# Altium PCB LEDControl1.PcbDoc (part 5 of 6)
Units mm, origin at the board's own origin, x right, y up, seen from the top; angles counter-clockwise.
Board outline 380 x 185 mm, 2 copper layers (Top Layer, Bottom Layer), stack 0.533 mm thick; 673 components, 368 nets, 1993 pads, 2553 vias.
Unrouted connection lines stored in the file: 1155.
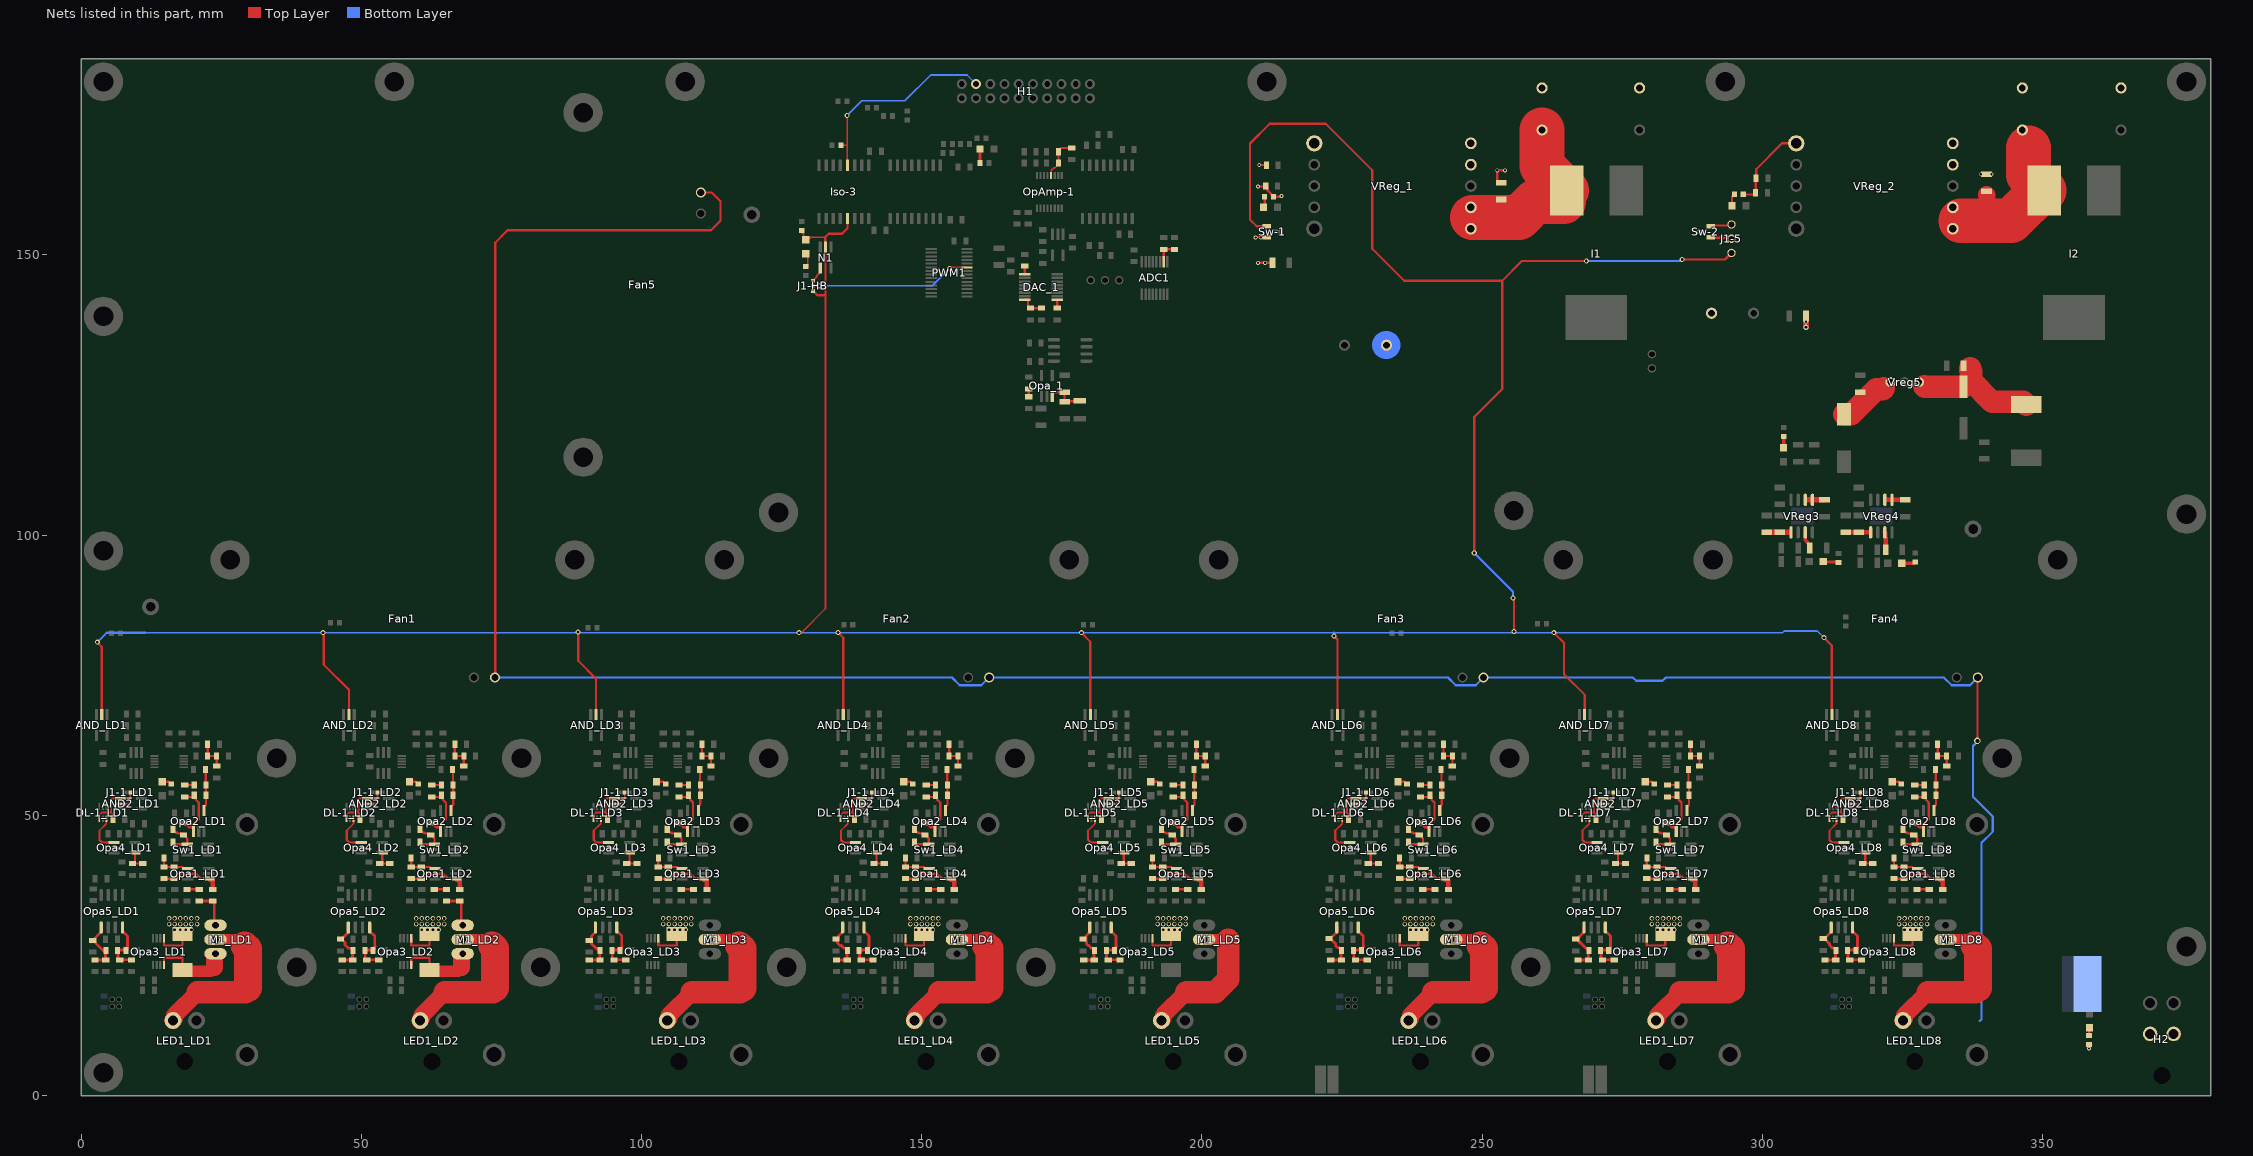
[diagram p5: the nets of this part, all layers, seen from the top]

## Via types
v1: diameter 0.7, hole 0.4, Top Layer to Bottom Layer, tented both sides, 1874 vias
v2: diameter 0.8, hole 0.5, Top Layer to Bottom Layer, tented both sides, 512 vias
v3: diameter 0.9, hole 0.5, Top Layer to Bottom Layer, tented both sides, 158 vias
v4: diameter 1.27, hole 0.711, Top Layer to Bottom Layer, tented both sides, 8 vias
v5: diameter 1.2, hole 0.7, Top Layer to Bottom Layer, tented both sides, 1 vias

## Nets (pads, with @x,y where several pads share a name; then routed paths per layer and width w, separated by ;. In a path a pad name is that pad's centre, name@x,y a point inside that pad or via, vN(x,y) a via of type N, cw(c..) or ccw(c..) an arc to the next point about the centre after c; other vN are vias at no path point) (continued)
GNDN: C2-8.2 C2-9.2 C2-10.2 C2-11.2 CE-1.2 CE-2.2 CE-3.2 CE-4.2 CE-5.2 CE-6.2 Fan1.2 Fan2.2 Fan3.2 Fan4.2 Fan5.2 H2.1 H2.2 J1-5.3 JG.1 Opa3_LD1.1 Opa3_LD2.1 Opa3_LD3.1 Opa3_LD4.1 Opa3_LD5.1 Opa3_LD6.1 Opa3_LD7.1 Opa3_LD8.1 R2-2.2 R2-3.2 R2-4.2 R5-1_LD1.2 R5-1_LD2.2 R5-1_LD3.2 R5-1_LD4.2 R5-1_LD5.2 R5-1_LD6.2 R5-1_LD7.2 R5-1_LD8.2 RLim-1.2 RLim-2.2 RTrim1.2 RTrim2.2 Sw-1.2 Sw-2.2 VReg_1.3 VReg_1.4 VReg_1.10 VReg_2.3 VReg_2.4 VReg_2.10 | length 550
  Top Layer w0.4: Opa3_LD1.1@14.8,28.073 14.8,26.8 18.1,26.8 R5-1_LD1.2@18.1,28.8 ; Opa3_LD2.1@58.9,28.073 58.9,26.8 62.2,26.8 R5-1_LD2.2@62.2,28.8 ; Fan1.2@73.85,74.6 73.9,74.65 73.9,152.2 76.1,154.4 112.4,154.4 114.1,156.1 114.1,159.6 112.55,161.15 Fan5.2@110.6,161.15 ; Opa3_LD3.1@103,28.073 103,26.8 106.3,26.8 R5-1_LD3.2@106.3,28.8 ; Opa3_LD4.1@147.1,28.073 147.1,26.8 150.4,26.8 R5-1_LD4.2@150.4,28.8 ; Opa3_LD5.1@191.2,28.073 191.2,26.8 194.5,26.8 R5-1_LD5.2@194.5,28.8 ; v1(209.6,153.1) 209.681,153.1 209.781,153.2 Sw-1.2@211.6,153.2 ; v1(210,148.6) C2-8.2@212.6,148.6 ; v1(210,162.2) 211.3,162.2 RTrim1.2@211.4,162.3 211.65,162.05 211.65,161.6 212.8,160.45 R2-3.2@212.8,160.4 214.019,160.4 214.119,160.5 v1(214.2,160.5) ; v1(210.241,166.038) 211.462,166.038 RLim-1.2@211.5,166 ; Opa3_LD6.1@235.3,28.073 235.3,26.8 238.6,26.8 R5-1_LD6.2@238.6,28.8 ; C2-9.2@253.4,162.9 253,162.9 252.7,163.2 v1(252.7,165.1) v1(254.1,165.1) ; Opa3_LD7.1@279.4,28.073 279.4,26.8 282.7,26.8 R5-1_LD7.2@282.7,28.8 ; Sw-2.2@290.8,155.1 290.97,155.27 294.33,155.27 J1-5.3@294.5,155.44 ; R2-2.2@296.6,160.8 298.55,160.8 298.8,161.05 RTrim2.2@298.8,161.1 298.85,161.15 298.85,163.65 RLim-2.2@298.9,163.7 298.9,165.3 303.52,169.92 VReg_2.4@306.06,169.92 ; Opa3_LD8.1@323.5,28.073 323.5,26.8 326.8,26.8 R5-1_LD8.2@326.8,28.8 ; v5(338.366,63.297) 338.408,63.339 338.408,74.558 Fan4.2@338.45,74.6 ; v1(358.3,8.4) R2-4.2@358.3,9.1
  Top Layer w1: v3(307.8,137.1) C2-11.2@307.8,139.1
  Bottom Layer w0.4: Fan1.2@73.85,74.6 155.4,74.6 156.8,73.2 160.65,73.2 Fan2.2@162.05,74.6 243.9,74.6 245.3,73.2 248.85,73.2 Fan3.2@250.25,74.6 276.9,74.6 277.5,74 282.2,74 282.8,74.6 332.4,74.6 333.8,73.2 337.05,73.2 Fan4.2@338.45,74.6 ; v5(338.366,63.297) 338.366,63.132 337.6,62.366 337.6,53.3 341.1,49.8 341.1,47.1 339.1,45.1 339.1,13.6 338.8,13.3
  Bottom Layer w5: CE-2.2@232.9,133.9 CE-2.2@232.95,133.9
  other v1: 307.8,138.1 211.3,148.6 210.5,153.1 339,164.4 340.9,164.4
  other v2: 16.7,29.6 17.7,29.6 18.7,29.6 19.7,29.6 60.8,29.6 61.8,29.6 62.8,29.6 63.8,29.6 104.9,29.6 105.9,29.6 106.9,29.6 107.9,29.6 149,29.6 150,29.6 151,29.6 152,29.6 193.1,29.6 194.1,29.6 195.1,29.6 196.1,29.6 237.2,29.6 238.2,29.6 239.2,29.6 240.2,29.6 281.3,29.6 282.3,29.6 283.3,29.6 284.3,29.6 325.4,29.6 326.4,29.6 327.4,29.6 328.4,29.6 15.7,30.6 16.7,30.6 17.7,30.6 18.7,30.6 19.7,30.6 20.7,30.6 59.8,30.6 60.8,30.6 61.8,30.6 62.8,30.6 63.8,30.6 64.8,30.6 103.9,30.6 104.9,30.6 105.9,30.6 106.9,30.6 107.9,30.6 108.9,30.6 148,30.6 149,30.6 150,30.6 151,30.6 152,30.6 153,30.6 192.1,30.6 193.1,30.6 194.1,30.6 195.1,30.6 196.1,30.6 197.1,30.6 236.2,30.6 237.2,30.6 238.2,30.6 239.2,30.6 240.2,30.6 241.2,30.6 280.3,30.6 281.3,30.6 282.3,30.6 283.3,30.6 284.3,30.6 285.3,30.6 324.4,30.6 325.4,30.6 326.4,30.6 327.4,30.6 328.4,30.6 329.4,30.6 15.7,31.6 16.7,31.6 17.7,31.6 18.7,31.6 19.7,31.6 20.7,31.6 59.8,31.6 60.8,31.6 61.8,31.6 62.8,31.6 63.8,31.6 64.8,31.6 103.9,31.6 104.9,31.6 105.9,31.6 106.9,31.6 107.9,31.6 108.9,31.6 148,31.6 149,31.6 150,31.6 151,31.6 152,31.6 153,31.6 192.1,31.6 193.1,31.6 194.1,31.6 195.1,31.6 196.1,31.6 197.1,31.6 236.2,31.6 237.2,31.6 238.2,31.6 239.2,31.6 240.2,31.6 241.2,31.6 280.3,31.6 281.3,31.6 282.3,31.6 283.3,31.6 284.3,31.6 285.3,31.6 324.4,31.6 325.4,31.6 326.4,31.6 327.4,31.6 328.4,31.6 329.4,31.6
HB: AND_LD1.2 AND_LD2.2 AND_LD3.2 AND_LD4.2 AND_LD5.2 AND_LD6.2 AND_LD7.2 AND_LD8.2 Iso-3.13 J1-5.1 J1-HB.3 LED7.2 N1.2 RPD_10.1 Sw-1.1 | length 711.3
  Top Layer w0.254: RPD_10.1@128.6,154 128.923,153.677 128.923,153.077 LED7.2@129.3,152.7 ; LED7.2@129.7,152.7 130.2,153.2 132.8,153.2
  Top Layer w0.3: v3(128.1,82.6) 128.55,82.6 132.85,86.9 132.85,142.8 N1.2@132.85,151.4
  Top Layer w0.4: v3(2.9,80.9) 3.7,80.1 AND_LD1.2@3.7,68 ; v3(43.2,82.6) 43.3,82.5 43.3,76.9 47.8,72.4 AND_LD2.2@47.8,68 ; v3(88.7,82.7) 88.7,77.6 91.9,74.4 AND_LD3.2@91.9,68 ; J1-HB.3@130.6,143.6 131.4,142.8 132.85,142.8 ; N1.2@132.85,151.4 132.8,151.45 132.8,153.2 133.4,153.8 135.8,153.8 136.77,154.77 Iso-3.13@136.77,156.5 ; v3(135.062,82.62) 135.08,82.62 136,81.7 AND_LD4.2@136,68 ; v3(178.5,82.6) 180.1,81 AND_LD5.2@180.1,68 ; Sw-1.1@211.6,155.1 209.8,155.1 208.6,156.3 208.6,169.9 212.1,173.4 222.1,173.4 230.4,165.1 230.4,151.1 236.1,145.4 253.6,145.4 ; v3(223.6,82) 224.2,81.4 AND_LD6.2@224.2,68 ; v3@248.6,96.935 248.6,121.1 253.6,126.1 253.6,145.4 ; v3(255.5,88.8) 255.6,88.8 255.7,88.7 v3(255.7,82.8) ; v3(262.8,82.6) 264.6,80.8 264.6,75.2 268.3,71.5 AND_LD7.2@268.3,68 ; v3(268.6,148.9) 257.1,148.9 253.6,145.4 ; v3(285.7,149.2) 293.34,149.2 J1-5.1@294.5,150.36 ; v3(311,81.7) 312.372,80.328 AND_LD8.2@312.372,68.969 ; AND_LD8.2@312.325,68.075 AND_LD8.2@312.4,68
  Bottom Layer w0.3: 11.5,82.6 v3(43.2,82.6) v3(128.1,82.6) v3(178.5,82.6) 223.6,82.6 255.7,82.6 v3(262.8,82.6) 303.6,82.6 303.9,82.9 309.832,82.9 v3@311,81.732
  Bottom Layer w0.4: v3(2.9,80.9) 4.6,82.6 11.5,82.6 ; v3(223.6,82) 223.6,82.6 ; v3(248.6,96.8) 255.5,89.9 v3(255.5,88.8) ; v3@255.7,82.6 v3(255.7,82.8) ; v3(268.6,148.9) 285.4,148.9 v3(285.7,149.2) ; v3(311,81.7) v3@311,81.732
HB\: J1-HB.2 PWM1.23 | length 28.9
  Top Layer w0.3: J1-HB.2@130.6,144.5 v3(131.7,144.5) ; v3(155,147.6) 155.2,147.8 PWM1.23@158.1,147.8
  Bottom Layer w0.3: v3(131.7,144.5) 151.9,144.5 v3(155,147.6)
HB_IN: H1.2 Iso-3.4 RPD_1.1 | length 36.7
  Top Layer w0.3: RPD_1.1@135.6,169.6 136.741,169.6 ; v3(136.712,174.887) 136.741,174.857 136.741,169.6 ; Iso-3.4@136.77,166 136.741,166.029 136.741,169.6
  Bottom Layer w0.3: v3(136.712,174.887) 136.712,174.888 136.7,174.9 139.3,177.5 147,177.5 151.6,182.1 158.1,182.1 H1.2@159.7,180.5
NetADC1_10: ADC1.10 R4-2.2 S.1@195.1,151 | length 4.1
  Top Layer w0.4: ADC1.10@193.2,148.8 R4-2.2@193.2,151 S.1@195.1,151
NetAND2_LD1_1: AND2_LD1.1 DL-1_LD1.4 R7-2_LD1.1 | length 8.5
  Top Layer w0.3: DL-1_LD1.4@3.25,49.4 3.275,49.425 3.275,50.075 3.7,50.5 5.1,50.5 ; R7-2_LD1.1@5.7,49.3 5.6,49.4 5.6,50.3 5.4,50.5 5.1,50.5 ; AND2_LD1.1@7.05,53 5.576,53 5.4,52.824 5.4,50.8 5.1,50.5
NetAND2_LD1_2: AND2_LD1.2 J1-1_LD1.2 | length 3.3
  Top Layer w0.3: AND2_LD1.2@7.05,52.05 7.1,52.1 8.3,52.1 8.8,52.6 J1-1_LD1.2@8.8,53.9
NetAND2_LD2_1: AND2_LD2.1 DL-1_LD2.4 R7-2_LD2.1 | length 8.5
  Top Layer w0.3: DL-1_LD2.4@47.35,49.4 47.375,49.425 47.375,50.075 47.8,50.5 49.2,50.5 ; R7-2_LD2.1@49.8,49.3 49.7,49.4 49.7,50.3 49.5,50.5 49.2,50.5 ; AND2_LD2.1@51.15,53 49.676,53 49.5,52.824 49.5,50.8 49.2,50.5
NetAND2_LD2_2: AND2_LD2.2 J1-1_LD2.2 | length 3.3
  Top Layer w0.3: AND2_LD2.2@51.15,52.05 51.2,52.1 52.4,52.1 52.9,52.6 J1-1_LD2.2@52.9,53.9
NetAND2_LD3_1: AND2_LD3.1 DL-1_LD3.4 R7-2_LD3.1 | length 8.5
  Top Layer w0.3: DL-1_LD3.4@91.45,49.4 91.475,49.425 91.475,50.075 91.9,50.5 93.3,50.5 ; R7-2_LD3.1@93.9,49.3 93.8,49.4 93.8,50.3 93.6,50.5 93.3,50.5 ; AND2_LD3.1@95.25,53 93.776,53 93.6,52.824 93.6,50.8 93.3,50.5
NetAND2_LD3_2: AND2_LD3.2 J1-1_LD3.2 | length 3.3
  Top Layer w0.3: AND2_LD3.2@95.25,52.05 95.3,52.1 96.5,52.1 97,52.6 J1-1_LD3.2@97,53.9
NetAND2_LD4_1: AND2_LD4.1 DL-1_LD4.4 R7-2_LD4.1 | length 8.5
  Top Layer w0.3: DL-1_LD4.4@135.55,49.4 135.575,49.425 135.575,50.075 136,50.5 137.4,50.5 ; R7-2_LD4.1@138,49.3 137.9,49.4 137.9,50.3 137.7,50.5 137.4,50.5 ; AND2_LD4.1@139.35,53 137.876,53 137.7,52.824 137.7,50.8 137.4,50.5
NetAND2_LD4_2: AND2_LD4.2 J1-1_LD4.2 | length 3.3
  Top Layer w0.3: AND2_LD4.2@139.35,52.05 139.4,52.1 140.6,52.1 141.1,52.6 J1-1_LD4.2@141.1,53.9
NetAND2_LD5_1: AND2_LD5.1 DL-1_LD5.4 R7-2_LD5.1 | length 8.5
  Top Layer w0.3: DL-1_LD5.4@179.65,49.4 179.675,49.425 179.675,50.075 180.1,50.5 181.5,50.5 ; R7-2_LD5.1@182.1,49.3 182,49.4 182,50.3 181.8,50.5 181.5,50.5 ; AND2_LD5.1@183.45,53 181.976,53 181.8,52.824 181.8,50.8 181.5,50.5
NetAND2_LD5_2: AND2_LD5.2 J1-1_LD5.2 | length 3.3
  Top Layer w0.3: AND2_LD5.2@183.45,52.05 183.5,52.1 184.7,52.1 185.2,52.6 J1-1_LD5.2@185.2,53.9
NetAND2_LD6_1: AND2_LD6.1 DL-1_LD6.4 R7-2_LD6.1 | length 8.5
  Top Layer w0.3: DL-1_LD6.4@223.75,49.4 223.775,49.425 223.775,50.075 224.2,50.5 225.6,50.5 ; R7-2_LD6.1@226.2,49.3 226.1,49.4 226.1,50.3 225.9,50.5 225.6,50.5 ; AND2_LD6.1@227.55,53 226.076,53 225.9,52.824 225.9,50.8 225.6,50.5
NetAND2_LD6_2: AND2_LD6.2 J1-1_LD6.2 | length 3.3
  Top Layer w0.3: AND2_LD6.2@227.55,52.05 227.6,52.1 228.8,52.1 229.3,52.6 J1-1_LD6.2@229.3,53.9
NetAND2_LD7_1: AND2_LD7.1 DL-1_LD7.4 R7-2_LD7.1 | length 8.5
  Top Layer w0.3: DL-1_LD7.4@267.85,49.4 267.875,49.425 267.875,50.075 268.3,50.5 269.7,50.5 ; R7-2_LD7.1@270.3,49.3 270.2,49.4 270.2,50.3 270,50.5 269.7,50.5 ; AND2_LD7.1@271.65,53 270.176,53 270,52.824 270,50.8 269.7,50.5
NetAND2_LD7_2: AND2_LD7.2 J1-1_LD7.2 | length 3.3
  Top Layer w0.3: AND2_LD7.2@271.65,52.05 271.7,52.1 272.9,52.1 273.4,52.6 J1-1_LD7.2@273.4,53.9
NetAND2_LD8_1: AND2_LD8.1 DL-1_LD8.4 R7-2_LD8.1 | length 8.5
  Top Layer w0.3: DL-1_LD8.4@311.95,49.4 311.975,49.425 311.975,50.075 312.4,50.5 313.8,50.5 ; R7-2_LD8.1@314.4,49.3 314.3,49.4 314.3,50.3 314.1,50.5 313.8,50.5 ; AND2_LD8.1@315.75,53 314.276,53 314.1,52.824 314.1,50.8 313.8,50.5
NetAND2_LD8_2: AND2_LD8.2 J1-1_LD8.2 | length 3.3
  Top Layer w0.3: AND2_LD8.2@315.75,52.05 315.8,52.1 317,52.1 317.5,52.6 J1-1_LD8.2@317.5,53.9
NetC1-1_LD1_2: C1-1_LD1.2 R2-1_LD1.2 | length 2.2
  Top Layer w0.5: C1-1_LD1.2@18.9,36.8 R2-1_LD1.2@21.1,36.8
NetC1-1_LD2_2: C1-1_LD2.2 R2-1_LD2.2 | length 2.2
  Top Layer w0.5: C1-1_LD2.2@63,36.8 R2-1_LD2.2@65.2,36.8
NetC1-1_LD3_2: C1-1_LD3.2 R2-1_LD3.2 | length 2.2
  Top Layer w0.5: C1-1_LD3.2@107.1,36.8 R2-1_LD3.2@109.3,36.8
NetC1-1_LD4_2: C1-1_LD4.2 R2-1_LD4.2 | length 2.2
  Top Layer w0.5: C1-1_LD4.2@151.2,36.8 R2-1_LD4.2@153.4,36.8
NetC1-1_LD5_2: C1-1_LD5.2 R2-1_LD5.2 | length 2.2
  Top Layer w0.5: C1-1_LD5.2@195.3,36.8 R2-1_LD5.2@197.5,36.8
NetC1-1_LD6_2: C1-1_LD6.2 R2-1_LD6.2 | length 2.2
  Top Layer w0.5: C1-1_LD6.2@239.4,36.8 R2-1_LD6.2@241.6,36.8
NetC1-1_LD7_2: C1-1_LD7.2 R2-1_LD7.2 | length 2.2
  Top Layer w0.5: C1-1_LD7.2@283.5,36.8 R2-1_LD7.2@285.7,36.8
NetC1-1_LD8_2: C1-1_LD8.2 R2-1_LD8.2 | length 2.2
  Top Layer w0.5: C1-1_LD8.2@327.6,36.8 R2-1_LD8.2@329.8,36.8
NetC1-2_LD1_1: C1-2_LD1.1 C2-2_LD1.1 Opa2_LD1.1 S.2@18.3,48.6 | length 11.9
  Top Layer w0.4: S.2@18.3,48.6 18.55,48.35 18.8,48.35 19.25,47.9 19.975,47.9 20.05,47.825 Opa2_LD1.1@20.05,47.1 20.125,47.175 20.125,48.425 21,49.3 21,52.3 20.45,52.85 20.45,53.35 C1-2_LD1.1@20.2,53.6 20.2,53.55 19.95,53.3 C2-2_LD1.1@18.5,53.3
NetC1-2_LD1_2: C1-2_LD1.2 Opa2_LD1.4 R3-3_LD1.1 R4-1_LD1.2 | length 7.1
  Top Layer w0.4: Opa2_LD1.4@21.95,50.85 21.95,51.575 22.3,51.925 C1-2_LD1.2@22.3,53.6 R4-1_LD1.2@22.3,55.4 22.25,55.45 22.25,57.75 R3-3_LD1.1@22.2,57.8
NetC1-2_LD2_1: C1-2_LD2.1 C2-2_LD2.1 Opa2_LD2.1 S.2@62.4,48.6 | length 11.9
  Top Layer w0.4: S.2@62.4,48.6 62.65,48.35 62.9,48.35 63.35,47.9 64.075,47.9 64.15,47.825 Opa2_LD2.1@64.15,47.1 64.225,47.175 64.225,48.425 65.1,49.3 65.1,52.3 64.55,52.85 64.55,53.35 C1-2_LD2.1@64.3,53.6 64.3,53.55 64.05,53.3 C2-2_LD2.1@62.6,53.3
NetC1-2_LD2_2: C1-2_LD2.2 Opa2_LD2.4 R3-3_LD2.1 R4-1_LD2.2 | length 7.1
  Top Layer w0.4: Opa2_LD2.4@66.05,50.85 66.05,51.575 66.4,51.925 C1-2_LD2.2@66.4,53.6 R4-1_LD2.2@66.4,55.4 66.35,55.45 66.35,57.75 R3-3_LD2.1@66.3,57.8
NetC1-2_LD3_1: C1-2_LD3.1 C2-2_LD3.1 Opa2_LD3.1 S.2@106.5,48.6 | length 11.9
  Top Layer w0.4: S.2@106.5,48.6 106.75,48.35 107,48.35 107.45,47.9 108.175,47.9 108.25,47.825 Opa2_LD3.1@108.25,47.1 108.325,47.175 108.325,48.425 109.2,49.3 109.2,52.3 108.65,52.85 108.65,53.35 C1-2_LD3.1@108.4,53.6 108.4,53.55 108.15,53.3 C2-2_LD3.1@106.7,53.3
NetC1-2_LD3_2: C1-2_LD3.2 Opa2_LD3.4 R3-3_LD3.1 R4-1_LD3.2 | length 7.1
  Top Layer w0.4: Opa2_LD3.4@110.15,50.85 110.15,51.575 110.5,51.925 C1-2_LD3.2@110.5,53.6 R4-1_LD3.2@110.5,55.4 110.45,55.45 110.45,57.75 R3-3_LD3.1@110.4,57.8
NetC1-2_LD4_1: C1-2_LD4.1 C2-2_LD4.1 Opa2_LD4.1 S.2@150.6,48.6 | length 11.9
  Top Layer w0.4: S.2@150.6,48.6 150.85,48.35 151.1,48.35 151.55,47.9 152.275,47.9 152.35,47.825 Opa2_LD4.1@152.35,47.1 152.425,47.175 152.425,48.425 153.3,49.3 153.3,52.3 152.75,52.85 152.75,53.35 C1-2_LD4.1@152.5,53.6 152.5,53.55 152.25,53.3 C2-2_LD4.1@150.8,53.3
NetC1-2_LD4_2: C1-2_LD4.2 Opa2_LD4.4 R3-3_LD4.1 R4-1_LD4.2 | length 7.1
  Top Layer w0.4: Opa2_LD4.4@154.25,50.85 154.25,51.575 154.6,51.925 C1-2_LD4.2@154.6,53.6 R4-1_LD4.2@154.6,55.4 154.55,55.45 154.55,57.75 R3-3_LD4.1@154.5,57.8
NetC1-2_LD5_1: C1-2_LD5.1 C2-2_LD5.1 Opa2_LD5.1 R1-2_LD5.2 | length 11.9
  Top Layer w0.4: R1-2_LD5.2@194.7,48.6 194.95,48.35 195.2,48.35 195.65,47.9 196.375,47.9 196.45,47.825 Opa2_LD5.1@196.45,47.1 196.525,47.175 196.525,48.425 197.4,49.3 197.4,52.3 196.85,52.85 196.85,53.35 C1-2_LD5.1@196.6,53.6 196.6,53.55 196.35,53.3 C2-2_LD5.1@194.9,53.3
NetC1-2_LD5_2: C1-2_LD5.2 Opa2_LD5.4 R3-3_LD5.1 R4-1_LD5.2 | length 7.1
  Top Layer w0.4: Opa2_LD5.4@198.35,50.85 198.35,51.575 198.7,51.925 C1-2_LD5.2@198.7,53.6 R4-1_LD5.2@198.7,55.4 198.65,55.45 198.65,57.75 R3-3_LD5.1@198.6,57.8
NetC1-2_LD6_1: C1-2_LD6.1 C2-2_LD6.1 Opa2_LD6.1 S.2@238.8,48.6 | length 11.9
  Top Layer w0.4: S.2@238.8,48.6 239.05,48.35 239.3,48.35 239.75,47.9 240.475,47.9 240.55,47.825 Opa2_LD6.1@240.55,47.1 240.625,47.175 240.625,48.425 241.5,49.3 241.5,52.3 240.95,52.85 240.95,53.35 C1-2_LD6.1@240.7,53.6 240.7,53.55 240.45,53.3 C2-2_LD6.1@239,53.3
NetC1-2_LD6_2: C1-2_LD6.2 Opa2_LD6.4 R3-3_LD6.1 R4-1_LD6.2 | length 7.1
  Top Layer w0.4: Opa2_LD6.4@242.45,50.85 242.45,51.575 242.8,51.925 C1-2_LD6.2@242.8,53.6 R4-1_LD6.2@242.8,55.4 242.75,55.45 242.75,57.75 R3-3_LD6.1@242.7,57.8
NetC1-2_LD7_1: C1-2_LD7.1 C2-2_LD7.1 Opa2_LD7.1 S.2@282.9,48.6 | length 11.9
  Top Layer w0.4: S.2@282.9,48.6 283.15,48.35 283.4,48.35 283.85,47.9 284.575,47.9 284.65,47.825 Opa2_LD7.1@284.65,47.1 284.725,47.175 284.725,48.425 285.6,49.3 285.6,52.3 285.05,52.85 285.05,53.35 C1-2_LD7.1@284.8,53.6 284.8,53.55 284.55,53.3 C2-2_LD7.1@283.1,53.3
NetC1-2_LD7_2: C1-2_LD7.2 Opa2_LD7.4 R3-3_LD7.1 R4-1_LD7.2 | length 7.1
  Top Layer w0.4: Opa2_LD7.4@286.55,50.85 286.55,51.575 286.9,51.925 C1-2_LD7.2@286.9,53.6 R4-1_LD7.2@286.9,55.4 286.85,55.45 286.85,57.75 R3-3_LD7.1@286.8,57.8
NetC1-2_LD8_1: C1-2_LD8.1 C2-2_LD8.1 Opa2_LD8.1 R1-2.2@327,48.6 | length 11.9
  Top Layer w0.4: R1-2.2@327,48.6 327.25,48.35 327.5,48.35 327.95,47.9 328.675,47.9 328.75,47.825 Opa2_LD8.1@328.75,47.1 328.825,47.175 328.825,48.425 329.7,49.3 329.7,52.3 329.15,52.85 329.15,53.35 C1-2_LD8.1@328.9,53.6 328.9,53.55 328.65,53.3 C2-2_LD8.1@327.2,53.3
NetC1-2_LD8_2: C1-2_LD8.2 Opa2_LD8.4 R3-3_LD8.1 R4-1_LD8.2 | length 7.1
  Top Layer w0.4: Opa2_LD8.4@330.65,50.85 330.65,51.575 331,51.925 C1-2_LD8.2@331,53.6 R4-1_LD8.2@331,55.4 330.95,55.45 330.95,57.75 R3-3_LD8.1@330.9,57.8
NetC1-12_1: C1-12.1 DAC_1.8 S.2@171.4,140.5 | length 4.3
  Top Layer w0.4: DAC_1.8@168.4,142 168.925,142 168.95,141.975 168.95,140.75 169.2,140.5 C1-12.1@169.4,140.5 S.2@171.4,140.5
NetC2-1_1: C2-1.1 C2-2.1 VReg4.1 | length 4.1
  Top Layer w0.8: C2-1.1@314.9,100.5 319,100.5
NetC2-1_LD1_1: C2-1_LD1.1 Opa1_LD1.1 R1-1_LD1.1 R3-1_LD1.1 | length 11.2
  Top Layer w0.4: C2-1_LD1.1@14.6,38.7 R3-1_LD1.1@16.6,38.7 16.8,38.7 17.7,39.6 20.5,39.6 21.201,38.899 21.375,38.725 22.725,38.725 Opa1_LD1.1@22.8,38.65
  Top Layer w0.8: Opa1_LD1.1@22.925,38.525 23.4,38.525 23.476,38.449 23.476,36.824 R1-1_LD1.1@23.5,36.8
NetC2-1_LD1_2: C2-1_LD1.2 Opa1_LD1.4 R3-1_LD1.2 R3-2_LD1.1 | length 6
  Top Layer w0.4: R3-2_LD1.1@14.8,42.4 C2-1_LD1.2@14.8,40.8 R3-1_LD1.2@16.6,40.8 18.075,40.8 18.325,40.55 Opa1_LD1.4@19.05,40.55
NetC2-1_LD2_1: C2-1_LD2.1 Opa1_LD2.1 R1-1_LD2.1 R3-1_LD2.1 | length 11.2
  Top Layer w0.4: C2-1_LD2.1@58.7,38.7 R3-1_LD2.1@60.7,38.7 60.9,38.7 61.8,39.6 64.6,39.6 65.301,38.899 65.475,38.725 66.825,38.725 Opa1_LD2.1@66.9,38.65
  Top Layer w0.8: Opa1_LD2.1@67.025,38.525 67.5,38.525 67.576,38.449 67.576,36.824 R1-1_LD2.1@67.6,36.8
NetC2-1_LD2_2: C2-1_LD2.2 Opa1_LD2.4 R3-1_LD2.2 R3-2_LD2.1 | length 6
  Top Layer w0.4: R3-2_LD2.1@58.9,42.4 C2-1_LD2.2@58.9,40.8 R3-1_LD2.2@60.7,40.8 62.175,40.8 62.425,40.55 Opa1_LD2.4@63.15,40.55
NetC2-1_LD3_1: C2-1_LD3.1 Opa1_LD3.1 R1-1_LD3.1 R3-1_LD3.1 | length 11.2
  Top Layer w0.4: C2-1_LD3.1@102.8,38.7 R3-1_LD3.1@104.8,38.7 105,38.7 105.9,39.6 108.7,39.6 109.401,38.899 109.575,38.725 110.925,38.725 Opa1_LD3.1@111,38.65
  Top Layer w0.8: Opa1_LD3.1@111.125,38.525 111.6,38.525 111.676,38.449 111.676,36.824 R1-1_LD3.1@111.7,36.8
NetC2-1_LD3_2: C2-1_LD3.2 Opa1_LD3.4 R3-1_LD3.2 R3-2_LD3.1 | length 6
  Top Layer w0.4: R3-2_LD3.1@103,42.4 C2-1_LD3.2@103,40.8 R3-1_LD3.2@104.8,40.8 106.275,40.8 106.525,40.55 Opa1_LD3.4@107.25,40.55
NetC2-1_LD4_1: C2-1_LD4.1 Opa1_LD4.1 R1-1_LD4.1 R3-1_LD4.1 | length 11.2
  Top Layer w0.4: C2-1_LD4.1@146.9,38.7 R3-1_LD4.1@148.9,38.7 149.1,38.7 150,39.6 152.8,39.6 153.501,38.899 153.675,38.725 155.025,38.725 Opa1_LD4.1@155.1,38.65
  Top Layer w0.8: Opa1_LD4.1@155.225,38.525 155.7,38.525 155.776,38.449 155.776,36.824 R1-1_LD4.1@155.8,36.8
NetC2-1_LD4_2: C2-1_LD4.2 Opa1_LD4.4 R3-1_LD4.2 R3-2_LD4.1 | length 6
  Top Layer w0.4: R3-2_LD4.1@147.1,42.4 C2-1_LD4.2@147.1,40.8 R3-1_LD4.2@148.9,40.8 150.375,40.8 150.625,40.55 Opa1_LD4.4@151.35,40.55
NetC2-1_LD5_1: C2-1_LD5.1 Opa1_LD5.1 R1-1_LD5.1 R3-1_LD5.1 | length 11.2
  Top Layer w0.4: C2-1_LD5.1@191,38.7 R3-1_LD5.1@193,38.7 193.2,38.7 194.1,39.6 196.9,39.6 197.601,38.899 197.775,38.725 199.125,38.725 Opa1_LD5.1@199.2,38.65
  Top Layer w0.8: Opa1_LD5.1@199.325,38.525 199.8,38.525 199.876,38.449 199.876,36.824 R1-1_LD5.1@199.9,36.8
NetC2-1_LD5_2: C2-1_LD5.2 Opa1_LD5.4 R3-1_LD5.2 R3-2_LD5.1 | length 6
  Top Layer w0.4: R3-2_LD5.1@191.2,42.4 C2-1_LD5.2@191.2,40.8 R3-1_LD5.2@193,40.8 194.475,40.8 194.725,40.55 Opa1_LD5.4@195.45,40.55
NetC2-1_LD6_1: C2-1_LD6.1 Opa1_LD6.1 R1-1_LD6.1 R3-1_LD6.1 | length 11.2
  Top Layer w0.4: C2-1_LD6.1@235.1,38.7 R3-1_LD6.1@237.1,38.7 237.3,38.7 238.2,39.6 241,39.6 241.701,38.899 241.875,38.725 243.225,38.725 Opa1_LD6.1@243.3,38.65
  Top Layer w0.8: Opa1_LD6.1@243.425,38.525 243.9,38.525 243.976,38.449 243.976,36.824 R1-1_LD6.1@244,36.8
NetC2-1_LD6_2: C2-1_LD6.2 Opa1_LD6.4 R3-1_LD6.2 R3-2_LD6.1 | length 6
  Top Layer w0.4: R3-2_LD6.1@235.3,42.4 C2-1_LD6.2@235.3,40.8 R3-1_LD6.2@237.1,40.8 238.575,40.8 238.825,40.55 Opa1_LD6.4@239.55,40.55
NetC2-1_LD7_1: C2-1_LD7.1 Opa1_LD7.1 R1-1_LD7.1 R3-1_LD7.1 | length 11.2
  Top Layer w0.4: C2-1_LD7.1@279.2,38.7 R3-1_LD7.1@281.2,38.7 281.4,38.7 282.3,39.6 285.1,39.6 285.801,38.899 285.975,38.725 287.325,38.725 Opa1_LD7.1@287.4,38.65
  Top Layer w0.8: Opa1_LD7.1@287.525,38.525 288,38.525 288.076,38.449 288.076,36.824 R1-1_LD7.1@288.1,36.8
NetC2-1_LD7_2: C2-1_LD7.2 Opa1_LD7.4 R3-1_LD7.2 R3-2_LD7.1 | length 6
  Top Layer w0.4: R3-2_LD7.1@279.4,42.4 C2-1_LD7.2@279.4,40.8 R3-1_LD7.2@281.2,40.8 282.675,40.8 282.925,40.55 Opa1_LD7.4@283.65,40.55
NetC2-1_LD8_1: C2-1_LD8.1 Opa1_LD8.1 R1-1_LD8.1 R3-1_LD8.1 | length 11.2
  Top Layer w0.4: C2-1_LD8.1@323.3,38.7 R3-1_LD8.1@325.3,38.7 325.5,38.7 326.4,39.6 329.2,39.6 329.901,38.899 330.075,38.725 331.425,38.725 Opa1_LD8.1@331.5,38.65
  Top Layer w0.8: Opa1_LD8.1@331.625,38.525 332.1,38.525 332.176,38.449 332.176,36.824 R1-1_LD8.1@332.2,36.8
NetC2-1_LD8_2: C2-1_LD8.2 Opa1_LD8.4 R3-1_LD8.2 R3-2_LD8.1 | length 6
  Top Layer w0.4: R3-2_LD8.1@323.5,42.4 C2-1_LD8.2@323.5,40.8 R3-1_LD8.2@325.3,40.8 326.775,40.8 327.025,40.55 Opa1_LD8.4@327.75,40.55
NetC2-2_LD1_2: C2-2_LD1.2 R4-1_LD1.1 | length 1.7
  Top Layer w0.4: C2-2_LD1.2@18.5,55.4 R4-1_LD1.1@20.2,55.4
NetC2-2_LD2_2: C2-2_LD2.2 R4-1_LD2.1 | length 1.7
  Top Layer w0.4: C2-2_LD2.2@62.6,55.4 R4-1_LD2.1@64.3,55.4
NetC2-2_LD3_2: C2-2_LD3.2 R4-1_LD3.1 | length 1.7
  Top Layer w0.4: C2-2_LD3.2@106.7,55.4 R4-1_LD3.1@108.4,55.4
NetC2-2_LD4_2: C2-2_LD4.2 R4-1_LD4.1 | length 1.7
  Top Layer w0.4: C2-2_LD4.2@150.8,55.4 R4-1_LD4.1@152.5,55.4
NetC2-2_LD5_2: C2-2_LD5.2 R4-1_LD5.1 | length 1.7
  Top Layer w0.4: C2-2_LD5.2@194.9,55.4 R4-1_LD5.1@196.6,55.4
NetC2-2_LD6_2: C2-2_LD6.2 R4-1_LD6.1 | length 1.7
  Top Layer w0.4: C2-2_LD6.2@239,55.4 R4-1_LD6.1@240.7,55.4
NetC2-2_LD7_2: C2-2_LD7.2 R4-1_LD7.1 | length 1.7
  Top Layer w0.4: C2-2_LD7.2@283.1,55.4 R4-1_LD7.1@284.8,55.4
NetC2-2_LD8_2: C2-2_LD8.2 R4-1_LD8.1 | length 1.7
  Top Layer w0.4: C2-2_LD8.2@327.2,55.4 R4-1_LD8.1@328.9,55.4
NetC2-3_LD1_2: C2-3_LD1.2 R7-3_LD1.1 S.1@18.3,46.5 Sw1_LD1.1 | length 7.2
  Top Layer w0.4: R7-3_LD1.1@16.4,45.2 16.4,45.1 16.65,44.85 Sw1_LD1.1@18.95,44.85 18.95,45.85 18.75,46.05 18.75,46.25 18.5,46.5 S.1@18.3,46.5 18.05,46.75 17.35,46.75 17.2,46.9 17,46.9 16.85,47.05 16.65,47.05 16.4,47.3 C2-3_LD1.2@16.4,47.5
NetC2-3_LD2_2: C2-3_LD2.2 R7-3_LD2.1 S.1@62.4,46.5 Sw1_LD2.1 | length 7.2
  Top Layer w0.4: R7-3_LD2.1@60.5,45.2 60.5,45.1 60.75,44.85 Sw1_LD2.1@63.05,44.85 63.05,45.85 62.85,46.05 62.85,46.25 62.6,46.5 S.1@62.4,46.5 62.15,46.75 61.45,46.75 61.3,46.9 61.1,46.9 60.95,47.05 60.75,47.05 60.5,47.3 C2-3_LD2.2@60.5,47.5
NetC2-3_LD3_2: C2-3_LD3.2 R7-3_LD3.1 S.1@106.5,46.5 Sw1_LD3.1 | length 7.2
  Top Layer w0.4: R7-3_LD3.1@104.6,45.2 104.6,45.1 104.85,44.85 Sw1_LD3.1@107.15,44.85 107.15,45.85 106.95,46.05 106.95,46.25 106.7,46.5 S.1@106.5,46.5 106.25,46.75 105.55,46.75 105.4,46.9 105.2,46.9 105.05,47.05 104.85,47.05 104.6,47.3 C2-3_LD3.2@104.6,47.5
NetC2-3_LD4_2: C2-3_LD4.2 R7-3_LD4.1 S.1@150.6,46.5 Sw1_LD4.1 | length 7.2
  Top Layer w0.4: R7-3_LD4.1@148.7,45.2 148.7,45.1 148.95,44.85 Sw1_LD4.1@151.25,44.85 151.25,45.85 151.05,46.05 151.05,46.25 150.8,46.5 S.1@150.6,46.5 150.35,46.75 149.65,46.75 149.5,46.9 149.3,46.9 149.15,47.05 148.95,47.05 148.7,47.3 C2-3_LD4.2@148.7,47.5
NetC2-3_LD5_2: C2-3_LD5.2 R1-2_LD5.1 R7-3_LD5.1 Sw1_LD5.1 | length 7.2
  Top Layer w0.4: R7-3_LD5.1@192.8,45.2 192.8,45.1 193.05,44.85 Sw1_LD5.1@195.35,44.85 195.35,45.85 195.15,46.05 195.15,46.25 194.9,46.5 R1-2_LD5.1@194.7,46.5 194.45,46.75 193.75,46.75 193.6,46.9 193.4,46.9 193.25,47.05 193.05,47.05 192.8,47.3 C2-3_LD5.2@192.8,47.5
NetC2-3_LD6_2: C2-3_LD6.2 R7-3_LD6.1 S.1@238.8,46.5 Sw1_LD6.1 | length 7.2
  Top Layer w0.4: R7-3_LD6.1@236.9,45.2 236.9,45.1 237.15,44.85 Sw1_LD6.1@239.45,44.85 239.45,45.85 239.25,46.05 239.25,46.25 239,46.5 S.1@238.8,46.5 238.55,46.75 237.85,46.75 237.7,46.9 237.5,46.9 237.35,47.05 237.15,47.05 236.9,47.3 C2-3_LD6.2@236.9,47.5
NetC2-3_LD7_2: C2-3_LD7.2 R7-3_LD7.1 S.1@282.9,46.5 Sw1_LD7.1 | length 7.2
  Top Layer w0.4: R7-3_LD7.1@281,45.2 281,45.1 281.25,44.85 Sw1_LD7.1@283.55,44.85 283.55,45.85 283.35,46.05 283.35,46.25 283.1,46.5 S.1@282.9,46.5 282.65,46.75 281.95,46.75 281.8,46.9 281.6,46.9 281.45,47.05 281.25,47.05 281,47.3 C2-3_LD7.2@281,47.5
NetC2-3_LD8_2: C2-3_LD8.2 R1-2.1@327,46.5 R7-3_LD8.1 Sw1_LD8.1 | length 7.2
  Top Layer w0.4: R7-3_LD8.1@325.1,45.2 325.1,45.1 325.35,44.85 Sw1_LD8.1@327.65,44.85 327.65,45.85 327.45,46.05 327.45,46.25 327.2,46.5 R1-2.1@327,46.5 326.75,46.75 326.05,46.75 325.9,46.9 325.7,46.9 325.55,47.05 325.35,47.05 325.1,47.3 C2-3_LD8.2@325.1,47.5
NetC2-4_LD1_2: C2-4_LD1.2 Opa4_LD1.4 S.1@9.2,41.4 | length 4
  Top Layer w0.4: S.1@9.2,41.4 S.1@9.4,41.4 ; Opa4_LD1.4@9.65,43.25 9.65,41.65 S.1@9.4,41.4 ; C2-4_LD1.2@11.2,41.4 S.1@9.4,41.4
NetC2-4_LD2_2: C2-4_LD2.2 Opa4_LD2.4 S.1@53.3,41.4 | length 4
  Top Layer w0.4: S.1@53.3,41.4 S.1@53.5,41.4 ; Opa4_LD2.4@53.75,43.25 53.75,41.65 S.1@53.5,41.4 ; C2-4_LD2.2@55.3,41.4 S.1@53.5,41.4
NetC2-4_LD3_2: C2-4_LD3.2 Opa4_LD3.4 S.1@97.4,41.4 | length 4
  Top Layer w0.4: S.1@97.4,41.4 S.1@97.6,41.4 ; Opa4_LD3.4@97.85,43.25 97.85,41.65 S.1@97.6,41.4 ; C2-4_LD3.2@99.4,41.4 S.1@97.6,41.4
NetC2-4_LD4_2: C2-4_LD4.2 Opa4_LD4.4 S.1@141.5,41.4 | length 4
  Top Layer w0.4: S.1@141.5,41.4 S.1@141.7,41.4 ; Opa4_LD4.4@141.95,43.25 141.95,41.65 S.1@141.7,41.4 ; C2-4_LD4.2@143.5,41.4 S.1@141.7,41.4
NetC2-4_LD5_2: C2-4_LD5.2 Opa4_LD5.4 R1-3_LD5.1 | length 4
  Top Layer w0.4: R1-3_LD5.1@185.6,41.4 R1-3_LD5.1@185.8,41.4 ; Opa4_LD5.4@186.05,43.25 186.05,41.65 R1-3_LD5.1@185.8,41.4 ; C2-4_LD5.2@187.6,41.4 R1-3_LD5.1@185.8,41.4
NetC2-4_LD6_2: C2-4_LD6.2 Opa4_LD6.4 S.1@229.7,41.4 | length 4
  Top Layer w0.4: S.1@229.7,41.4 S.1@229.9,41.4 ; Opa4_LD6.4@230.15,43.25 230.15,41.65 S.1@229.9,41.4 ; C2-4_LD6.2@231.7,41.4 S.1@229.9,41.4
NetC2-4_LD7_2: C2-4_LD7.2 Opa4_LD7.4 S.1@273.8,41.4 | length 4
  Top Layer w0.4: S.1@273.8,41.4 S.1@274,41.4 ; Opa4_LD7.4@274.25,43.25 274.25,41.65 S.1@274,41.4 ; C2-4_LD7.2@275.8,41.4 S.1@274,41.4
NetC2-4_LD8_2: C2-4_LD8.2 Opa4_LD8.4 R1-3_LD8.1 | length 4
  Top Layer w0.4: R1-3_LD8.1@317.9,41.4 R1-3_LD8.1@318.1,41.4 ; Opa4_LD8.4@318.35,43.25 318.35,41.65 R1-3_LD8.1@318.1,41.4 ; C2-4_LD8.2@319.9,41.4 R1-3_LD8.1@318.1,41.4
NetC2-5_2: C2-5.2 VReg4.3 | length 3.2
  Top Layer w0.8: VReg4.3@321.87,100.5 321.97,100.4 321.97,99.58 322,99.55 C2-5.2@322,97.4
NetC2-5_LD1_1: C2-5_LD1.1 R3-4_LD1.2 R8-1_LD1.1 S.2@22.6,60.6 | length 5.5
  Top Layer w0.4: C2-5_LD1.1@22.6,62.7 S.2@22.6,60.6 R8-1_LD1.1@24.2,60.6 R3-4_LD1.2@24.2,58.8
NetC2-5_LD2_1: C2-5_LD2.1 R3-4_LD2.2 R8-1_LD2.1 S.2@66.7,60.6 | length 5.5
  Top Layer w0.4: C2-5_LD2.1@66.7,62.7 S.2@66.7,60.6 R8-1_LD2.1@68.3,60.6 R3-4_LD2.2@68.3,58.8
NetC2-5_LD3_1: C2-5_LD3.1 R3-4_LD3.2 R8-1_LD3.1 S.2@110.8,60.6 | length 5.5
  Top Layer w0.4: C2-5_LD3.1@110.8,62.7 S.2@110.8,60.6 R8-1_LD3.1@112.4,60.6 R3-4_LD3.2@112.4,58.8
NetC2-5_LD4_1: C2-5_LD4.1 R3-4_LD4.2 R8-1_LD4.1 S.2@154.9,60.6 | length 5.5
  Top Layer w0.4: C2-5_LD4.1@154.9,62.7 S.2@154.9,60.6 R8-1_LD4.1@156.5,60.6 R3-4_LD4.2@156.5,58.8
NetC2-5_LD5_1: C2-5_LD5.1 R3-4_LD5.2 R8-1_LD5.1 | length 5.5
  Top Layer w0.4: C2-5_LD5.1@199,62.7 R3-4_LD5.2@199,60.6 R8-1_LD5.1@200.6,60.6 R3-4_LD5.2@200.6,58.8
NetC2-5_LD6_1: C2-5_LD6.1 R3-4_LD6.2 R8-1_LD6.1 S.2@243.1,60.6 | length 5.5
  Top Layer w0.4: C2-5_LD6.1@243.1,62.7 S.2@243.1,60.6 R8-1_LD6.1@244.7,60.6 R3-4_LD6.2@244.7,58.8
NetC2-5_LD7_1: C2-5_LD7.1 R3-4_LD7.2 R8-1_LD7.1 S.2@287.2,60.6 | length 5.5
  Top Layer w0.4: C2-5_LD7.1@287.2,62.7 S.2@287.2,60.6 R8-1_LD7.1@288.8,60.6 R3-4_LD7.2@288.8,58.8
NetC2-5_LD8_1: C2-5_LD8.1 R1-4.2 R3-4_LD8.2 R8-1_LD8.1 | length 5.5
  Top Layer w0.4: C2-5_LD8.1@331.3,62.7 R1-4.2@331.3,60.6 R8-1_LD8.1@332.9,60.6 R3-4_LD8.2@332.9,58.8
NetC2-6_LD1_1: C2-6_LD1.1 Opa5_LD1.4 R9-1_LD1.1 R12-1_LD1.2 S.1@6.9,24.2 | length 10
  Top Layer w0.5: Opa5_LD1.4@7.4,30.2 7.4,29.4 8.3,28.5 8.3,26.7 8.343,26.657 8.2,26.514 8.2,26.1 R9-1_LD1.1@8,25.9 ; R9-1_LD1.1@7.7,25.95 6.45,25.95 6.4,25.9 6.6,25.7 6.6,24.4 6.8,24.2 S.1@6.9,24.2 6.95,24.25 C2-6_LD1.1@8.8,24.25
NetC2-6_LD2_1: C2-6_LD2.1 Opa5_LD2.4 R9-1_LD2.1 R12-1_LD2.2 S.1@51,24.2 | length 10
  Top Layer w0.5: Opa5_LD2.4@51.5,30.2 51.5,29.4 52.4,28.5 52.4,26.7 52.443,26.657 52.3,26.514 52.3,26.1 R9-1_LD2.1@52.1,25.9 ; R9-1_LD2.1@51.8,25.95 50.55,25.95 50.5,25.9 50.7,25.7 50.7,24.4 50.9,24.2 S.1@51,24.2 51.05,24.25 C2-6_LD2.1@52.9,24.25
NetC2-6_LD3_1: C2-6_LD3.1 Opa5_LD3.4 R9-1_LD3.1 R12-1_LD3.2 S.1@95.1,24.2 | length 10
  Top Layer w0.5: Opa5_LD3.4@95.6,30.2 95.6,29.4 96.5,28.5 96.5,26.7 96.543,26.657 96.4,26.514 96.4,26.1 R9-1_LD3.1@96.2,25.9 ; R9-1_LD3.1@95.9,25.95 94.65,25.95 94.6,25.9 94.8,25.7 94.8,24.4 95,24.2 S.1@95.1,24.2 95.15,24.25 C2-6_LD3.1@97,24.25
NetC2-6_LD4_1: C2-6_LD4.1 Opa5_LD4.4 R9-1_LD4.1 R12-1_LD4.2 S.1@139.2,24.2 | length 10
  Top Layer w0.5: Opa5_LD4.4@139.7,30.2 139.7,29.4 140.6,28.5 140.6,26.7 140.643,26.657 140.5,26.514 140.5,26.1 R9-1_LD4.1@140.3,25.9 ; R9-1_LD4.1@140,25.95 138.75,25.95 138.7,25.9 138.9,25.7 138.9,24.4 139.1,24.2 S.1@139.2,24.2 139.25,24.25 C2-6_LD4.1@141.1,24.25
NetC2-6_LD5_1: C2-6_LD5.1 Opa5_LD5.4 R1-7_LD5.1 R9-1_LD5.1 R12-1_LD5.2 | length 10
  Top Layer w0.5: Opa5_LD5.4@183.8,30.2 183.8,29.4 184.7,28.5 184.7,26.7 184.743,26.657 184.6,26.514 184.6,26.1 R9-1_LD5.1@184.4,25.9 ; R9-1_LD5.1@184.1,25.95 182.85,25.95 182.8,25.9 183,25.7 183,24.4 183.2,24.2 R1-7_LD5.1@183.3,24.2 183.35,24.25 C2-6_LD5.1@185.2,24.25
NetC2-6_LD6_1: C2-6_LD6.1 Opa5_LD6.4 R9-1_LD6.1 R12-1_LD6.2 S.1@227.4,24.2 | length 10
  Top Layer w0.5: Opa5_LD6.4@227.9,30.2 227.9,29.4 228.8,28.5 228.8,26.7 228.843,26.657 228.7,26.514 228.7,26.1 R9-1_LD6.1@228.5,25.9 ; R9-1_LD6.1@228.2,25.95 226.95,25.95 226.9,25.9 227.1,25.7 227.1,24.4 227.3,24.2 S.1@227.4,24.2 227.45,24.25 C2-6_LD6.1@229.3,24.25
NetC2-6_LD7_1: C2-6_LD7.1 Opa5_LD7.4 R9-1_LD7.1 R12-1_LD7.2 S.1@271.5,24.2 | length 10
  Top Layer w0.5: Opa5_LD7.4@272,30.2 272,29.4 272.9,28.5 272.9,26.7 272.943,26.657 272.8,26.514 272.8,26.1 R9-1_LD7.1@272.6,25.9 ; R9-1_LD7.1@272.3,25.95 271.05,25.95 271,25.9 271.2,25.7 271.2,24.4 271.4,24.2 S.1@271.5,24.2 271.55,24.25 C2-6_LD7.1@273.4,24.25
NetC2-6_LD8_1: C2-6_LD8.1 Opa5_LD8.4 R9-1_LD8.1 R12-1_LD8.2 S.1@315.6,24.2 | length 10
  Top Layer w0.5: Opa5_LD8.4@316.1,30.2 316.1,29.4 317,28.5 317,26.7 317.043,26.657 316.9,26.514 316.9,26.1 R9-1_LD8.1@316.7,25.9 ; R9-1_LD8.1@316.4,25.95 315.15,25.95 315.1,25.9 315.3,25.7 315.3,24.4 315.5,24.2 S.1@315.6,24.2 315.65,24.25 C2-6_LD8.1@317.5,24.25
NetC2-7_2: C2-7.2 VReg4.5 VReg4.6 | length 3.3
  Top Layer w0.8: 322.2,106.4 322.3,106.3 C2-7.2@325.5,106.3
NetC2-7_LD1_1: C2-7_LD1.1 Opa5_LD1.1 R9-2_LD1.1 R12-1_LD1.1 S.1@4.4,24.2 | length 9.5
  Top Layer w0.5: R9-2_LD1.1@1.8,27.4 2,27.6 2.2,27.6 2.4,27.8 2.4,28.01 3.59,29.2 Opa5_LD1.1@3.59,30 Opa5_LD1.1@3.59,30.2 ; C2-7_LD1.1@2.5,24.2 S.1@4.4,24.2 4.35,24.25 4.35,25.85 4.3,25.9 3.9,25.9 2.6,27.2
NetC2-7_LD2_1: C2-7_LD2.1 Opa5_LD2.1 R9-2_LD2.1 R12-1_LD2.1 S.1@48.5,24.2 | length 9.9
  Top Layer w0.5: R9-2_LD2.1@46.1,27.7 R9-2_LD2.1@46.3,27.9 R9-2_LD2.1@46.5,27.9 ; C2-7_LD2.1@46.6,24.2 S.1@48.5,24.2 48.45,24.25 48.45,25.85 R12-1_LD2.1@48.4,25.9 ; Opa5_LD2.1@47.69,30 47.671,29.981 47.671,29.071 R9-2_LD2.1@46.5,27.9 ; R12-1_LD2.1@48.541,25.89 48.541,26.09 48.341,26.29 47.71,26.29 47.1,26.9 47.1,27.3 R9-2_LD2.1@46.5,27.9
NetC2-7_LD3_1: C2-7_LD3.1 Opa5_LD3.1 R9-2_LD3.1 R12-1_LD3.1 S.1@92.6,24.2 | length 9.5
  Top Layer w0.5: R9-2_LD3.1@90.5,27.5 R9-2_LD3.1@90.7,27.7 R9-2_LD3.1@90.9,27.7 ; C2-7_LD3.1@90.7,24.2 S.1@92.6,24.2 92.55,24.25 92.55,25.85 92.5,25.9 92.5,26.041 92.441,26.1 92.1,26.1 91.4,26.8 91.393,26.8 91.1,27.093 91.1,27.5 R9-2_LD3.1@90.9,27.7 ; Opa5_LD3.1@91.79,30 91.79,29.173 91.1,28.483 91.1,27.9 R9-2_LD3.1@90.9,27.7
NetC2-7_LD4_1: C2-7_LD4.1 Opa5_LD4.1 R9-2_LD4.1 R12-1_LD4.1 S.1@136.7,24.2 | length 9.8
  Top Layer w0.5: R9-2_LD4.1@134.5,27.7 R9-2_LD4.1@134.7,27.9 R9-2_LD4.1@134.8,27.9 ; C2-7_LD4.1@134.8,24.2 S.1@136.7,24.2 136.65,24.25 136.65,25.85 R12-1_LD4.1@136.6,25.9 ; Opa5_LD4.1@135.89,30 135.89,29.2 135.1,28.41 135.1,28.1 134.9,27.9 R9-2_LD4.1@134.8,27.9 ; R12-1_LD4.1@136.741,25.89 136.741,26.09 136.541,26.29 136.161,26.29 135.651,26.8 135.4,26.8 135,27.2 135,27.7 R9-2_LD4.1@134.8,27.9
NetC2-7_LD5_1: C2-7_LD5.1 Opa5_LD5.1 R1-6_LD5.1 R9-2_LD5.1 R12-1_LD5.1 | length 9.8
  Top Layer w0.5: R9-2_LD5.1@178.7,27.7 178.9,27.7 R9-2_LD5.1@179.1,27.9 ; C2-7_LD5.1@178.9,24.2 R1-6_LD5.1@180.8,24.2 180.75,24.25 180.75,26.181 180.641,26.29 180.261,26.29 180.141,26.41 180.141,26.507 179.848,26.8 179.7,26.8 179.4,27.1 179.4,27.4 179.3,27.5 179.3,27.7 R9-2_LD5.1@179.1,27.9 ; R9-2_LD5.1@178.9,27.9 R9-2_LD5.1@179.1,27.9 ; Opa5_LD5.1@179.99,30 179.99,29.173 179.3,28.483 179.3,28.1 R9-2_LD5.1@179.1,27.9
NetC2-7_LD6_1: C2-7_LD6.1 Opa5_LD6.1 R9-2_LD6.1 R12-1_LD6.1 S.1@224.9,24.2 | length 9.8
  Top Layer w0.5: R9-2_LD6.1@222.5,27.8 R9-2_LD6.1@222.7,28 R9-2_LD6.1@222.9,28 ; C2-7_LD6.1@223,24.2 S.1@224.9,24.2 224.85,24.25 224.85,25.85 R12-1_LD6.1@224.8,25.9 ; Opa5_LD6.1@224.09,30 224.09,29.19 R9-2_LD6.1@222.9,28 ; R12-1_LD6.1@224.941,25.89 224.941,26.09 224.741,26.29 224.541,26.29 224.422,26.41 224.193,26.41 223.9,26.703 223.9,27 R9-2_LD6.1@222.9,28
NetC2-7_LD7_1: C2-7_LD7.1 Opa5_LD7.1 R9-2_LD7.1 R12-1_LD7.1 S.1@269,24.2 | length 9.8
  Top Layer w0.5: R9-2_LD7.1@266.5,27.7 R9-2_LD7.1@266.7,27.9 R9-2_LD7.1@266.9,27.9 ; C2-7_LD7.1@267.1,24.2 S.1@269,24.2 268.95,24.25 268.95,25.85 R12-1_LD7.1@268.9,25.9 ; Opa5_LD7.1@268.19,30 268.19,29.19 R9-2_LD7.1@266.9,27.9 ; R12-1_LD7.1@269.041,25.89 269.041,26.09 268.841,26.29 268.51,26.29 R9-2_LD7.1@266.9,27.9
NetC2-7_LD8_1: C2-7_LD8.1 Opa5_LD8.1 R9-2_LD8.1 R12-1_LD8.1 S.1@313.1,24.2 | length 9.8
  Top Layer w0.5: R9-2_LD8.1@310.7,27.8 R9-2_LD8.1@310.9,28 R9-2_LD8.1@311.1,28 ; C2-7_LD8.1@311.2,24.2 S.1@313.1,24.2 313.05,24.25 313.05,25.85 R12-1_LD8.1@313,25.9 ; Opa5_LD8.1@312.29,30 312.29,29.19 R9-2_LD8.1@311.1,28 ; R12-1_LD8.1@313.141,25.89 313.141,26.09 312.941,26.29 312.561,26.29 312,26.851 312,27.1 R9-2_LD8.1@311.1,28
NetC2-9_1: C2-9.1 CE-1.1 I1.2 VReg_1.1 VReg_1.9 | length 32.7
  Top Layer w5: 248.2,156.6 248.3,156.7 ; I1.2@264.575,159.5 265.075,160 I1.2@265.075,161.5
  Top Layer w8: 248.3,156.7 256.6,156.7 259.4,159.5 I1.2@264.575,159.5 ; CE-1.1@260.7,172.3 260.7,165.875 264.075,162.5 264.075,162 264.575,161.5 I1.2@265.075,161.5
NetC2-10_1: C2-10.1 CE-6.1 I2.2 VReg_2.1 VReg_2.9 | length 30.4
  Top Layer w3: 340,160.8 340.1,160.7 340.1,156.1
  Top Layer w8: 335.4,156.1 340.1,156.1 344.4,156.1 I2.2@349.8,161.5 ; 347.5,169.1 347.5,164.3 349.3,162.5 349.3,162 I2.2@349.8,161.5 ; I2.2@350.3,161.5 I2.2@349.8,161.5
NetC2-13_1: C2-13.1 CE-7.1 I3.2 Vreg5.1 | length 21
  Top Layer w4: 328.9,126.6 329,126.5 CE-7.1@335.9,126.5 ; 337.1,129.8 337.1,129.4 337.3,129.2 337.3,127.5 341,123.8 346.6,123.8 I3.2@347.1,123.3
NetC2-14_1: C2-14.1 F1.1 Vreg5.3 | length 8.4
  Top Layer w4: F1.1@314.6,121.6 F1.1@315.3,121.6 ; 315.9,121.6 320.3,126 321.5,126 321.7,126.2
NetC2-16_2: C2-16.2 VReg3.3 | length 3.1
  Top Layer w0.6: VReg3.3@307.67,100.5 307.67,99.13 308,98.8 308,98.65 308.5,98.15 C2-16.2@308.5,97.7
NetC2-19_1: C2-19.1 C2-20.1 VReg3.1 | length 4
  Top Layer w1: C2-20.1@300.8,100.5 C2-19.1@303.1,100.5 304.8,100.5
NetC2-22_2: C2-22.2 VReg3.5 VReg3.6 | length 3.1
  Top Layer w1: 308,106.3 C2-22.2@311.1,106.3
NetC4-1_1: C4-1.1 Opa_1.3 R7-1.1 R8-1.2 | length 7.4
  Top Layer w0.4: Opa_1.3@173.3,124.75 173.3,125.425 173.375,125.5 R8-1.2@175.5,125.5 R7-1.1@175.5,123.8 175.6,123.9 178.1,123.9 C4-1.1@178.2,124
NetC5-1_2: C5-1.2 R10-1.2 | length 1.4
  Top Layer w0.4: R10-1.2@169.1,124.7 C5-1.2@169.1,126.1
NetC6-1_1: C6-1.1 OpAmp-1.12 R3-1.2 R3-2.2 | length 7.7
  Top Layer w0.3: OpAmp-1.12@173.1,164.171 173.1,165.1 173.5,165.5 173.7,165.5 174.4,166.2 R3-2.2@174.4,166.4 R3-1.2@174.4,168.4 174.4,168.6 174.9,169.1 C6-1.1@176.8,169.1
NetDAC_1_1: DAC_1.1 R5-1.1 | length 1.5
  Top Layer w0.4: DAC_1.1@168.4,146.55 R5-1.1@168.4,148
NetDAC_1_9: DAC_1.9 R5-2.2 | length 1.5
  Top Layer w0.4: R5-2.2@174.2,140.5 DAC_1.9@174.2,142
NetDL-1_LD1_6: DL-1_LD1.6 Opa4_LD1.1 | length 7.1
  Top Layer w0.3: 3.3,47.3 4.525,48.525 4.525,49.375 DL-1_LD1.6@4.55,49.4
  Top Layer w0.4: 3.3,47.3 3.3,45.6 3.75,45.15 Opa4_LD1.1@5.9,45.15
NetDL-1_LD2_6: DL-1_LD2.6 Opa4_LD2.1 | length 7.1
  Top Layer w0.3: 47.4,47.3 48.625,48.525 48.625,49.375 DL-1_LD2.6@48.65,49.4
  Top Layer w0.4: 47.4,47.3 47.4,45.6 47.85,45.15 Opa4_LD2.1@50,45.15
NetDL-1_LD3_6: DL-1_LD3.6 Opa4_LD3.1 | length 7.1
  Top Layer w0.3: 91.5,47.3 92.725,48.525 92.725,49.375 DL-1_LD3.6@92.75,49.4
  Top Layer w0.4: 91.5,47.3 91.5,45.6 91.95,45.15 Opa4_LD3.1@94.1,45.15
NetDL-1_LD4_6: DL-1_LD4.6 Opa4_LD4.1 | length 7.1
  Top Layer w0.3: 135.6,47.3 136.825,48.525 136.825,49.375 DL-1_LD4.6@136.85,49.4
  Top Layer w0.4: 135.6,47.3 135.6,45.6 136.05,45.15 Opa4_LD4.1@138.2,45.15
NetDL-1_LD5_6: DL-1_LD5.6 Opa4_LD5.1 | length 7.1
  Top Layer w0.3: 179.7,47.3 180.925,48.525 180.925,49.375 DL-1_LD5.6@180.95,49.4
  Top Layer w0.4: 179.7,47.3 179.7,45.6 180.15,45.15 Opa4_LD5.1@182.3,45.15
NetDL-1_LD6_6: DL-1_LD6.6 Opa4_LD6.1 | length 7.1
  Top Layer w0.3: 223.8,47.3 225.025,48.525 225.025,49.375 DL-1_LD6.6@225.05,49.4
  Top Layer w0.4: 223.8,47.3 223.8,45.6 224.25,45.15 Opa4_LD6.1@226.4,45.15
NetDL-1_LD7_6: DL-1_LD7.6 Opa4_LD7.1 | length 7.1
  Top Layer w0.3: 267.9,47.3 269.125,48.525 269.125,49.375 DL-1_LD7.6@269.15,49.4
  Top Layer w0.4: 267.9,47.3 267.9,45.6 268.35,45.15 Opa4_LD7.1@270.5,45.15
NetDL-1_LD8_6: DL-1_LD8.6 Opa4_LD8.1 | length 7.1
  Top Layer w0.3: 312,47.3 313.225,48.525 313.225,49.375 DL-1_LD8.6@313.25,49.4
  Top Layer w0.4: 312,47.3 312,45.6 312.45,45.15 Opa4_LD8.1@314.6,45.15
NetJ1-5_2: J1-5.2 Sw-2.1 | length 3.8
  Top Layer w0.4: Sw-2.1@290.8,153.2 290.95,153.05 294.35,153.05 J1-5.2@294.5,152.9
NetJ1-HB_1: J1-HB.1 N1.4 | length 2.8
  Top Layer w0.3: J1-HB.1@130.6,145.4 131.288,146.088 131.288,146.312 131.9,146.925 N1.4@131.9,147.65
NetLED1-1_1: LED1-1.1 R2-1.1 | length 2.5
  Top Layer w0.6: LED1-1.1@324.9,95 327.05,95 327.25,95.2 R2-1.1@327.3,95.2
NetLED1-2_1: LED1-2.1 R2-4.1 | length 1.4
  Top Layer w0.5: R2-4.1@358.3,10.7 358.35,10.75 358.35,12.05 LED1-2.1@358.4,12.1
NetLED1-3_1: LED1-3.1 R2-2.1 | length 2.2
  Top Layer w0.4: LED1-3.1@294.6,158.8 294.6,160.35 295,160.75 R2-2.1@295,160.8
NetLED1-4_1: LED1-4.1 R2-3.1 | length 2
  Top Layer w0.4: LED1-4.1@211,158.5 211.2,158.7 R2-3.1@211.2,160.4
NetLED1-5_1: LED1-5.1 R2-5.1 | length 2.8
  Top Layer w0.6: LED1-5.1@310.9,95.3 311,95.2 313.5,95.2 R2-5.1@313.6,95.1
NetLED1-6_1: LED1-6.1 R2-6.1 | length 2
  Top Layer w0.6: LED1-6.1@303.8,115.6 R2-6.1@303.8,117.6
NetLED1_LD1_1: LED1_LD1.1 M1_LD1.2 | length 29.6
  Top Layer w2: M1_LD1.2@24,27.85 28.15,27.85 29.2,26.8
  Top Layer w3: LED1_LD1.1@16.4,13.4 16.7,13.7 16.7,14.333 20.785,18.418
  Top Layer w4: 20.785,18.418 29.418,18.418 29.9,18.9
  Top Layer w5: 29.2,26.8 29.8,26.2 29.8,19.2
NetLED1_LD2_1: LED1_LD2.1 M1_LD2.2 | length 29.6
  Top Layer w2: M1_LD2.2@68.1,27.85 72.25,27.85 73.3,26.8
  Top Layer w3: LED1_LD2.1@60.5,13.4 60.8,13.7 60.8,14.333 64.885,18.418
  Top Layer w4: 64.885,18.418 73.518,18.418 74,18.9
  Top Layer w5: 73.3,26.8 73.9,26.2 73.9,19.2
NetLED1_LD3_1: LED1_LD3.1 M1_LD3.2 | length 29.6
  Top Layer w2: M1_LD3.2@112.2,27.85 116.35,27.85 117.4,26.8
  Top Layer w3: LED1_LD3.1@104.6,13.4 104.9,13.7 104.9,14.333 108.985,18.418
  Top Layer w4: 108.985,18.418 117.618,18.418 118.1,18.9
  Top Layer w5: 117.4,26.8 118,26.2 118,19.2
NetLED1_LD4_1: LED1_LD4.1 M1_LD4.2 | length 29.6
  Top Layer w2: M1_LD4.2@156.3,27.85 160.45,27.85 161.5,26.8
  Top Layer w3: LED1_LD4.1@148.7,13.4 149,13.7 149,14.333 153.085,18.418
  Top Layer w4: 153.085,18.418 161.718,18.418 162.2,18.9
  Top Layer w5: 161.5,26.8 162.1,26.2 162.1,19.2
NetLED1_LD5_1: LED1_LD5.1 M1_LD5.2 | length 26.7
  Top Layer w2: M1_LD5.2@200.4,27.85 204.712,27.85
  Top Layer w3: LED1_LD5.1@192.8,13.4 193.1,13.7 193.1,14.333 197.185,18.418
  Top Layer w4: 197.185,18.418 202.369,18.418 204.712,20.761 204.712,27.85
NetLED1_LD6_1: LED1_LD6.1 M1_LD6.2 | length 29.6
  Top Layer w2: M1_LD6.2@244.5,27.85 248.65,27.85 249.7,26.8
  Top Layer w3: LED1_LD6.1@236.9,13.4 237.2,13.7 237.2,14.333 241.285,18.418
  Top Layer w4: 241.285,18.418 249.918,18.418 250.4,18.9
  Top Layer w5: 249.7,26.8 250.3,26.2 250.3,19.2
NetLED1_LD7_1: LED1_LD7.1 M1_LD7.2 | length 29.6
  Top Layer w2: M1_LD7.2@288.6,27.85 292.75,27.85 293.8,26.8
  Top Layer w3: LED1_LD7.1@281,13.4 281.3,13.7 281.3,14.333 285.385,18.418
  Top Layer w4: 285.385,18.418 294.018,18.418 294.5,18.9
  Top Layer w5: 293.8,26.8 294.4,26.2 294.4,19.2
NetLED1_LD8_1: LED1_LD8.1 M1_LD8.2 | length 29.6
  Top Layer w2: M1_LD8.2@332.7,27.85 336.85,27.85 337.9,26.8
  Top Layer w3: LED1_LD8.1@325.1,13.4 325.4,13.7 325.4,14.333 329.485,18.418
  Top Layer w4: 329.485,18.418 338.118,18.418 338.6,18.9
  Top Layer w5: 337.9,26.8 338.5,26.2 338.5,19.2
NetLED7_1: LED7.1 R2-7.1 | length 2.3
  Top Layer w0.254: R2-7.1@129.7,147.9 LED7.1@129.7,150.2
NetLED-8_1: LED-8.1 R2-8.1 | length 2.5
  Top Layer w0.5: R2-8.1@160.4,166.4 LED-8.1@160.4,168.9
NetLEDC_1_LD1_1: LEDC_1_LD1.1 R13-1_LD1.1 | length 1.8
  Top Layer w0.4: LEDC_1_LD1.1@14.5,56 15.65,56 16.05,55.6 R13-1_LD1.1@16.1,55.6
NetLEDC_1_LD2_1: LEDC_1_LD2.1 R13-1_LD2.1 | length 1.8
  Top Layer w0.4: LEDC_1_LD2.1@58.6,56 59.75,56 60.15,55.6 R13-1_LD2.1@60.2,55.6
NetLEDC_1_LD3_1: LEDC_1_LD3.1 R13-1_LD3.1 | length 1.8
  Top Layer w0.4: LEDC_1_LD3.1@102.7,56 103.85,56 104.25,55.6 R13-1_LD3.1@104.3,55.6
NetLEDC_1_LD4_1: LEDC_1_LD4.1 R13-1_LD4.1 | length 1.8
  Top Layer w0.4: LEDC_1_LD4.1@146.8,56 147.95,56 148.35,55.6 R13-1_LD4.1@148.4,55.6
NetLEDC_1_LD5_1: LEDC_1_LD5.1 R13-1_LD5.1 | length 1.8
  Top Layer w0.4: LEDC_1_LD5.1@190.9,56 192.05,56 192.45,55.6 R13-1_LD5.1@192.5,55.6
NetLEDC_1_LD6_1: LEDC_1_LD6.1 R13-1_LD6.1 | length 1.8
  Top Layer w0.4: LEDC_1_LD6.1@235,56 236.15,56 236.55,55.6 R13-1_LD6.1@236.6,55.6
NetLEDC_1_LD7_1: LEDC_1_LD7.1 R13-1_LD7.1 | length 1.8
  Top Layer w0.4: LEDC_1_LD7.1@279.1,56 280.25,56 280.65,55.6 R13-1_LD7.1@280.7,55.6
NetLEDC_1_LD8_1: LEDC_1_LD8.1 R13-1_LD8.1 | length 1.8
  Top Layer w0.4: LEDC_1_LD8.1@323.2,56 324.35,56 324.75,55.6 R13-1_LD8.1@324.8,55.6
NetM1_LD1_1: M1_LD1.1 R1-1_LD1.2 R2-1_LD1.1 | length 7
  Top Layer w0.4: M1_LD1.1@23.75,30.64 R1-1_LD1.2@23.75,34.65
  Top Layer w0.5: R2-1_LD1.1@21.1,34.7 R1-1_LD1.2@23.5,34.7
  Top Layer w0.8: R1-1_LD1.2@23.5,34.7 23.7,34.7 R1-1_LD1.2@23.75,34.65 ; M1_LD1.1@23.75,30.64 M1_LD1.1@24,30.39
NetM1_LD1_3: M1_LD1.3 Opa3_LD1.8 R5-1_LD1.1 | length 14.7
  Top Layer w0.4: Opa3_LD1.8@14.8,23.273 14.8,24.6 18.1,24.6 18.1,22.2 R5-1_LD1.1@18.3,22.2
  Top Layer w2: R5-1_LD1.1@18.3,22.2 23.2,22.2 ; M1_LD1.3@23.8,24.827 cw(c24.483,24.827) M1_LD1.3@24,25.31
  Top Layer w3: 23.8,22.8 M1_LD1.3@23.8,24.827
NetM1_LD2_1: M1_LD2.1 R1-1_LD2.2 R2-1_LD2.1 | length 7
  Top Layer w0.4: M1_LD2.1@67.85,30.64 R1-1_LD2.2@67.85,34.65
  Top Layer w0.5: R2-1_LD2.1@65.2,34.7 R1-1_LD2.2@67.6,34.7
  Top Layer w0.8: R1-1_LD2.2@67.6,34.7 67.8,34.7 R1-1_LD2.2@67.85,34.65 ; M1_LD2.1@67.85,30.64 M1_LD2.1@68.1,30.39
NetM1_LD2_3: M1_LD2.3 Opa3_LD2.8 R5-1_LD2.1 | length 14.7
  Top Layer w0.4: Opa3_LD2.8@58.9,23.273 58.9,24.6 62.2,24.6 62.2,22.2 R5-1_LD2.1@62.4,22.2
  Top Layer w2: R5-1_LD2.1@62.4,22.2 67.3,22.2 ; M1_LD2.3@67.9,24.827 cw(c68.583,24.827) M1_LD2.3@68.1,25.31
  Top Layer w3: 67.9,22.8 M1_LD2.3@67.9,24.827